# Altium PCB PCB1.L298N.PcbDoc
Units mm, origin at the board's own origin, x right, y up, seen from the top; angles counter-clockwise.
Board outline 67.75 x 52.75 mm, 2 copper layers (Top Layer, Bottom Layer); 20 components, 14 nets, 57 pads, 0 vias.
Unrouted connection lines stored in the file: 10.
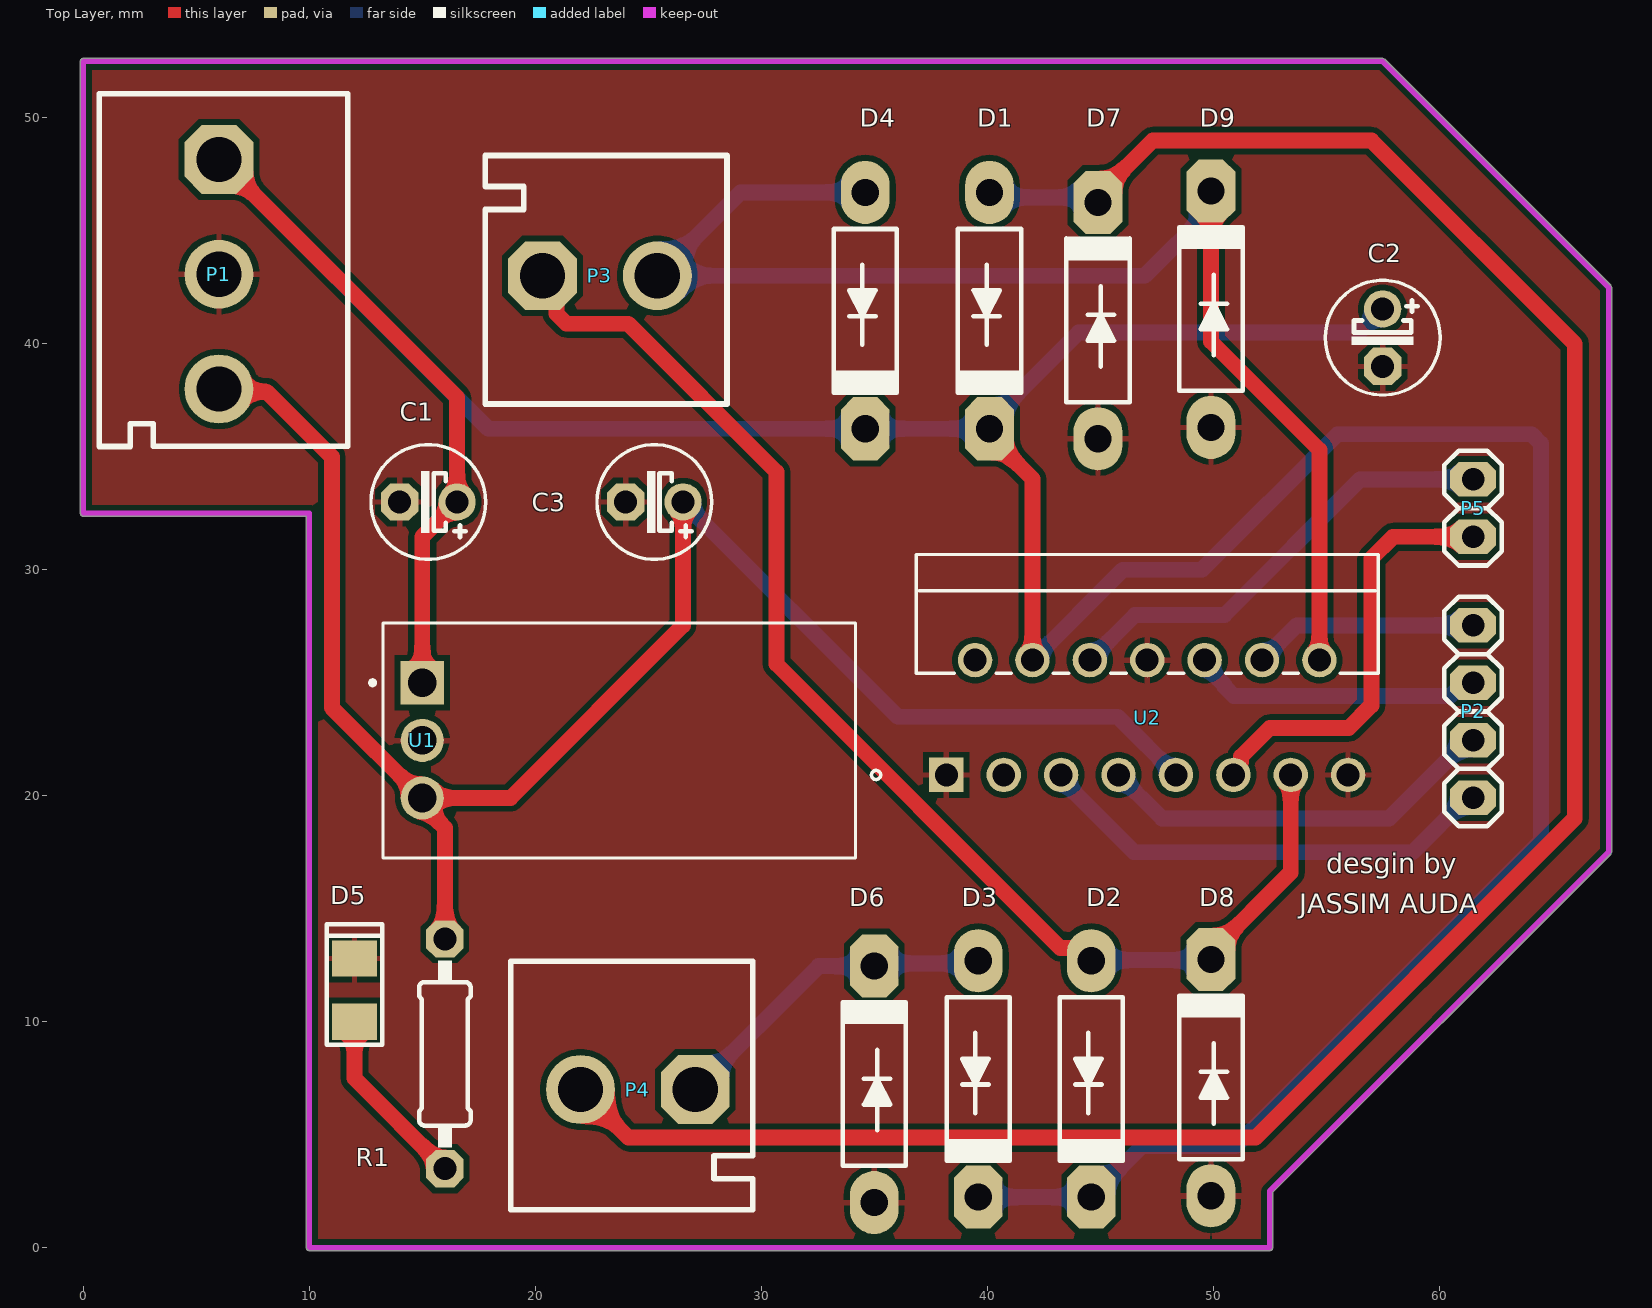
[diagram p0: Top Layer view]
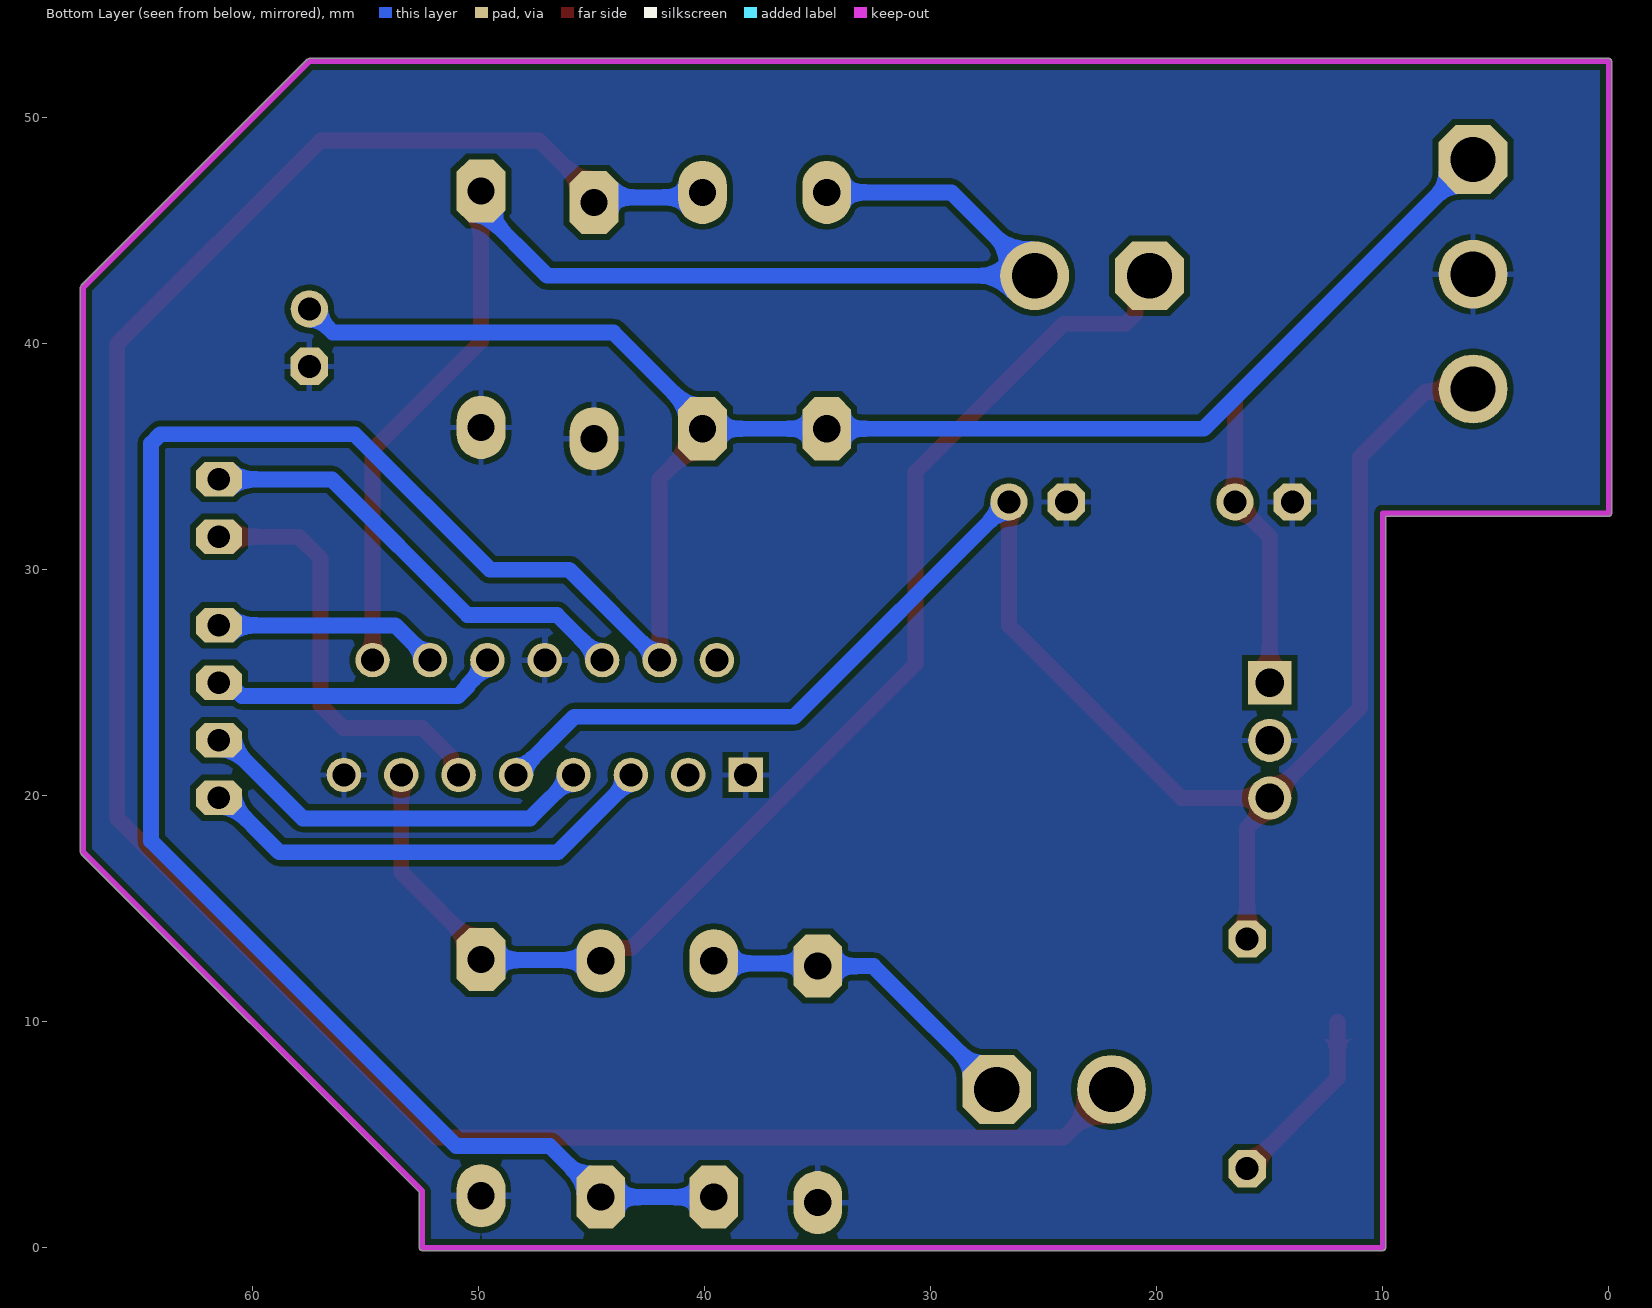
[diagram p1: Bottom Layer view, seen from below]
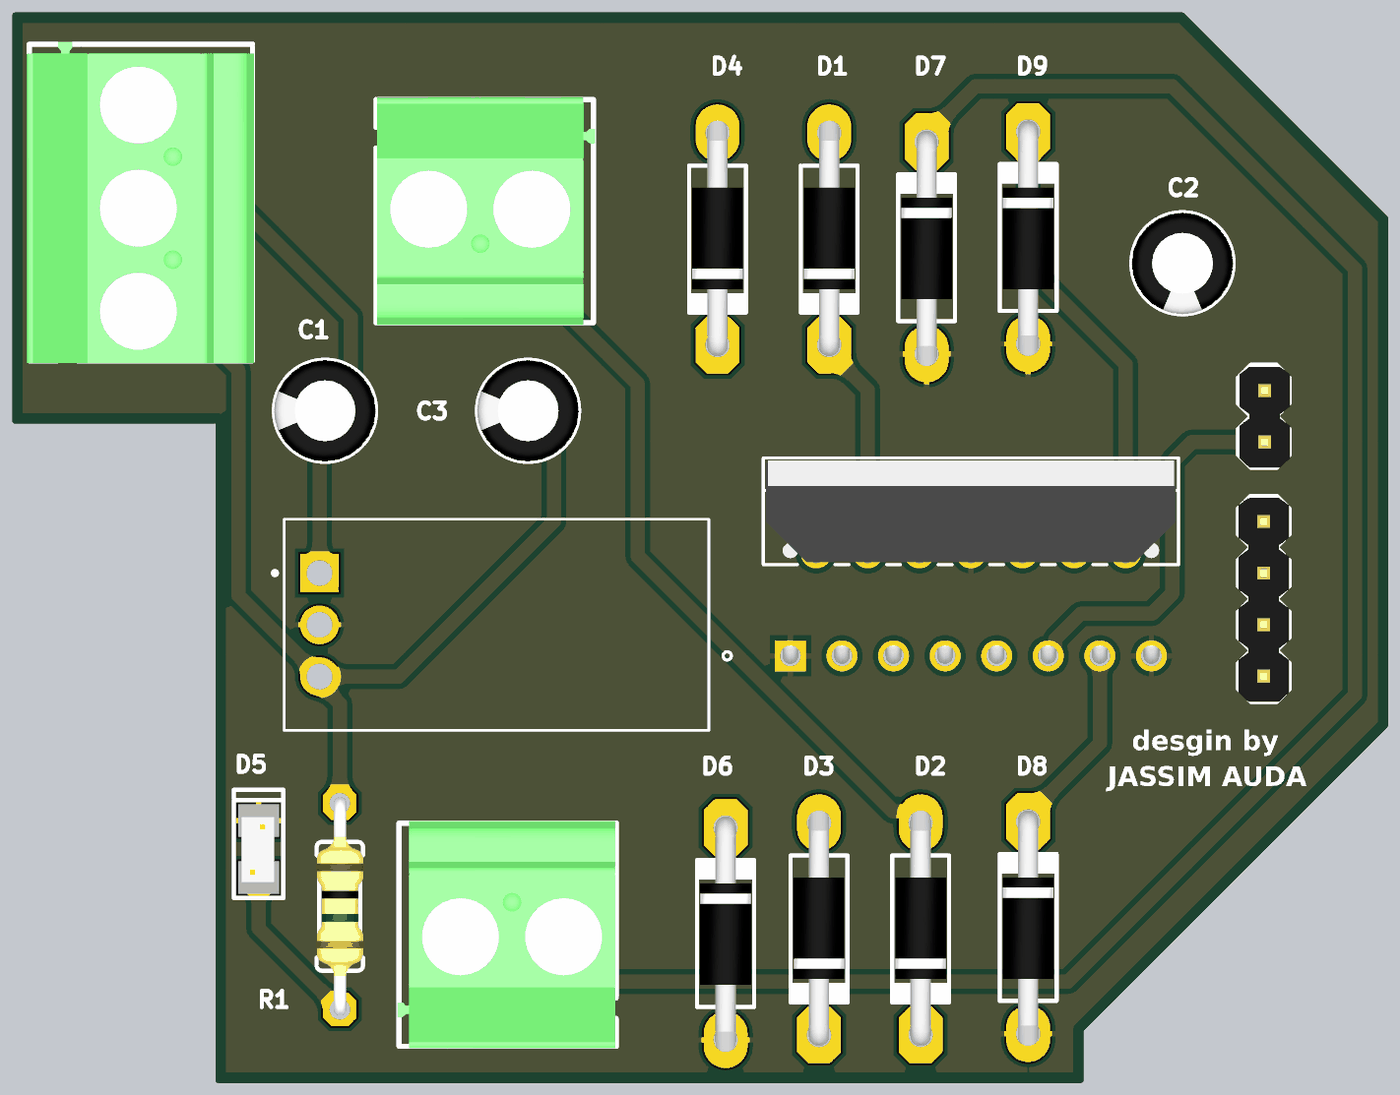
[diagram p2: 3D render of the assembled board from above, using the file's embedded part models]

## Layer stack, top to bottom
Top Solder: solder mask 0.0102, Solder Resist, Dk 3.5
Top Layer: signal copper 0.0356
Dielectric 1: dielectric 0.32, FR-4, Dk 4.8
Bottom Layer: signal copper 0.0356
Bottom Solder: solder mask 0.0102, Solder Resist, Dk 3.5

## Board outline
0,32.373 cw(c0,32.5) -0.127,32.5 -0.127,52.5 cw(c0,52.5) 0,52.627 57.5,52.627 57.59,52.59 67.59,42.59 67.627,42.5 67.627,17.5 67.59,17.41 52.627,2.447 52.627,0 cw(c52.5,0) 52.5,-0.127 10,-0.127 cw(c10,0) 9.873,0 9.873,32.373

## Design rules (kind name [scope] priority, off if disabled: settings)
Clearance [All] p1: gap=0.254 ignorepadtopadclearanceinfootprint=FALSE
PolygonConnect [All] p1: connectstyle=Relief reliefconductorwidth=0.254 reliefentries=4 polygonreliefangle="90 Angle" airgapwidth=0.254
RoutingVias [All] p1: holewidth=0.711 width=1.27 viastyle="Through Hole" minholewidth=0.711 minwidth=1.27 maxholewidth=0.711 maxwidth=1.27
SilkToSolderMaskClearance [IsPad] p1: minsilkscreentomaskgap=0 clearancetoexposedcopper=TRUE
SolderMaskExpansion [All] p1: expansion=0.102 istentingtop=FALSE
SupplyNets "Schematic Supply Nets_2" [InNet('+5')] p1: voltage=0.000
SupplyNets "Schematic Supply Nets_1" [InNet('GND')] p2: voltage=0.000
SupplyNets "Schematic Supply Nets" [InNet('VCC')] p3: voltage=0.000
Width [All] p1: maxlimit=8 minlimit=0.254 preferedwidth=0.254
29 further rules are at their usual default settings.

## Components (designator, comment, footprint, x,y, rotation, side; value= is the part's Value field where it differs from the comment)
C1 "100UF" MY_E2.5-5mm 15.27,33 r180 top
C2 "100uF" MY_E2.5-5mm 57.5,40.27 r270 top
C3 "10UF" MY_E2.5-5mm 25.27,33 r180 top
D1 "1N4007" My_DO41 40,41.5 r90 top
D2 "1N4007" My_DO41 44.5,7.5 r90 top
D3 "1N4007" My_DO41 39.5,7.5 r90 top
D4 "1N4007" My_DO41 34.5,41.5 r90 top
D5 "LED" MY_LED_1206 11.873,11.527 r270 top
D6 "1N4007" My_DO41 35.102,7.2 r270 top
D7 "1N4007" My_DO41 45,41 r270 top
D8 "1N4007" My_DO41 50,7.5 r270 top
D9 "1N4007" My_DO41 50,41.5 r270 top
P1 "Header 3" My_CN3 6.013,43.042 r270 top
P2 "Header 4" My_1X04 61.5,23.73 r90 top
P3 "Header 2" My_CN2 23,43 r0 top
P4 "Header 2" My_CN2 24.4,7.013 r180 top
P5 "Header 2" My_1X02 61.5,34 r90 top
R1 "1K" MY_(0.25w)_0207_10 16,8.58 r270 top
U1 "L7805CV" TO255P1040X460X1968-3 15,25 r270 top
U2 "L298N" Multiwatt15_V_STM_REN 38.19,20.92 r0 top

## Footprints (in the part's own frame and the unit in brackets; to place one, negate y for a bottom-side part, rotate by r counter-clockwise, add the part's x,y. Pads: shape width x height; smd on the part's side, far side on the other; paste and mask are expansions set on the pad)
Multiwatt15_V_STM_REN [mil]
  rect 60x60 / inner round 60 / far side rect 60x60 hole 40 paste-99999 mask+0: 1(0,0)
  round 60 hole 40 paste-99999 mask+0: 2(50,200) 3(100,0) 4(150,200) 5(200,0) 6(250,200) 7(300,0) 8(350,200) 9(400,0) 10(450,200) 11(500,0) 12(550,200) 13(600,0) 14(650,200) 15(700,0)
  silkscreen extent -130,-8 752,384, body extent -48,-15 748,379, height 713
My_1X02 [mil]
  oct 60x80 hole 39.37: 1(-100,0) 2(0,0)
  silkscreen extent -150,-50 50,50, body extent -150,-51 46,47, height 323
My_1X04 [mil]
  oct 60x80 hole 39.37: 1(-150,0) 2(-50,0) 3(50,0) 4(150,0)
  silkscreen extent -200,-50 200,50, body extent -200,-49 196,49, height 323
MY_(0.25w)_0207_10 [mil]
  oct 65x65 hole 40: 1(-200,0) 2(200,0)
  silkscreen extent -163,-45 163,45, body extent -212,-45 212,46, height 96
My_CN2 [mil]
  oct 120x120 hole 78.74: 1(-105.5,0.5)
  round 120 hole 78.74: 2(94.5,0.5)
  silkscreen extent -206,-223 216,210, body extent -203,-227 219,214, height 721
My_CN3 [mil]
  oct 120x120 hole 78.74: 1(-201.5,-0.5)
  round 120 hole 78.74: 2(-1.5,-0.5) 3(198.5,-0.5)
  silkscreen extent -316,-209 299,224, body extent -320,-214 302,227, height 721
My_DO41 [mil]
  oval 110x85 hole 47.24: A(204.71,-4)
  oct 110x85 hole 47.24: K(-207.1,-4)
  silkscreen extent -148,-59 141,51, body extent -228,-53 228,45, height 104
MY_E2.5-5mm [mil]
  round 65 hole 40: +(-50,0)
  oct 65x65 hole 40: -(50,0)
  silkscreen extent -100,-100 100,100, body extent -98,-98 98,98, height 395
MY_LED_1206 [mm]
  rect 1.6x2 smd: A(1.527,0.127) K(-1.273,0.127)
  silkscreen extent -2.79,-1.09 2.54,1.35, body extent -1.45,-0.71 1.75,0.89, height 1.12
TO255P1040X460X1968-3 [mm]
  rect 1.91x1.91 / inner round 1.91 / far side rect 1.91x1.91 hole 1.27: 1(0,0)
  round 1.91 hole 1.27: 2(2.55,0) 3(5.1,0)
  silkscreen extent -2.65,-2.29 7.75,19.18, body extent -2.56,-0.2 7.64,19.06, height 4.5

## Part data
C1 C2 C3: library part "Cap Pol", "Polar capacitor", ASiD Part Number=C-AS, Volte=25v
D1 D2 D3 D4 D6 D7 D8 D9: "1 Amp Diode", ASiD Part Number=1n4007-AS
D5: "Typical INFRARED GaAs LED", ASiD Part Number=LED-AS
P1: "Header, 3-Pin", ASiD Part Number="Header 3-AS"
P2: "Header, 4-Pin", ASiD Part Number="Header 4-AS"
P3 P4 P5: "Header, 2-Pin", ASiD Part Number="Header 2-AS"
R1: library part Res, "Standard resistor", ASiD Part Number=Res-AS
U1: "Linear Voltage Regulator IC Positive Fixed 1 Output 1.5A TO-220", Package="TO-220-3 STMicroelectronics", Check_prices=https://www.snapeda.com/parts/L7805CV/STMicroelectronics/view-part/?ref=eda, MF=STMicroelectronics, MP=L7805CV, SnapEDA_Link=https://www.snapeda.com/parts/L7805CV/STMicroelectronics/view-part/?ref=snap
U2: "Description", Manufacturer_Name="Renesas Electronics", Copyright="Copyright (C) 2025 Ultra Librarian. All rights reserved.", Manufacturer_Part_Number=L298N, RefDes=RefDes, Type="Power Management"

## Nets (pads, with @x,y where several pads share a name; then routed paths per layer and width w, separated by ;. In a path a pad name is that pad's centre, name@x,y a point inside that pad or via, vN(x,y) a via of type N, cw(c..) or ccw(c..) an arc to the next point about the centre after c; other vN are vias at no path point)
+5: C3.+ P1.3 R1.1 U1.3 U2.9 | length 76.6
  Top Layer w0.7: P1.3 6.12,37.88 8.12,37.88 11,35 11,23.9 U1.3 ; R1.1 16,18.573 15,19.573 U1.3 ; C3.+ 26.54,27.54 18.9,19.9 U1.3
  Bottom Layer w0.7: C3.+ 36.04,23.5 45.77,23.5 U2.9
EN1: P5.1 U2.11 | length 19.1
  Top Layer w0.7: U2.11 50.89,21.143 51.236,21.489 51.236,21.736 52.5,23 56,23 57,24 57,30.5 57.96,31.46 P5.1
EN2: P5.2 U2.6 | length 20.3
  Bottom Layer w0.7: U2.6 46.54,28 50.5,28 56.5,34 P5.2
GND: C1.- C2.- C3.- D5.K D6.A D7.A D8.A D9.A P1.2 U1.2 U2.1 U2.8 U2.15
IN1: P2.1 U2.5 | length 20.8
  Bottom Layer w0.7: U2.5 43.27,20.73 46.5,17.5 58.826,17.5 61.246,19.92 P2.1
IN2: P2.2 U2.7 | length 17.9
  Bottom Layer w0.7: U2.7 47.73,19 57.786,19 61.246,22.46 P2.2
IN3: P2.3 U2.10 | length 13
  Bottom Layer w0.7: U2.10 49.62,25.777 50.505,24.892 50.505,24.822 50.915,24.412 60.482,24.412 61.07,25 P2.3
IN4: P2.4 U2.12 | length 10
  Bottom Layer w0.7: U2.12 53.7,27.54 P2.4
NetD5_A: D5.A R1.2 | length 8.2
  Top Layer w0.7: D5.A 12,7.5 R1.2
OUT1: D3.A D6.K P4.1 | length 14.9
  Bottom Layer w0.7: P4.1 32.54,12.46 D6.K 35.12,12.58 39.482,12.58 D3.A
OUT2: D1.A D7.K P4.2 | length 102.9
  Top Layer w0.7: P4.2 24.128,4.872 51.872,4.872 66,19 66,40 57,49 47.32,49 44.898,46.578 D7.K
  Bottom Layer w0.7: D1.A 40.321,46.48 44.679,46.48 D7.K
OUT3: D2.A D8.K P3.1 U2.13 | length 57.4
  Top Layer w0.7: P3.1 20.937,42.396 20.937,41.331 21.383,40.885 24.115,40.885 30.673,34.327 30.673,25.827 43.236,13.264 44.038,13.264 D2.A ; D8.K 49.898,13.078 53.43,16.61 U2.13
  Bottom Layer w0.7: D2.A 44.632,12.73 49.868,12.73 D8.K
OUT4: D4.A D9.K P3.2 U2.14 | length 59
  Top Layer w0.7: D9.K@49.898,46.26 49.898,40.102 54.7,35.3 U2.14
  Bottom Layer w0.7: D4.A 29.087,46.7 P3.2 46.968,43.013 49.898,45.943 D9.K@49.898,46.26
VCC: C1.+ C2.+ D1.K D2.K D3.K D4.K P1.1 U1.1 U2.4 | length 173.5
  Top Layer w0.7: P1.1 16.54,37.62 C1.+ 15,31.46 U1.1 ; D1.K 40.102,35.922 42,34.024 U2.4
  Bottom Layer w0.7: P1.1 17.92,36.24 D4.K D1.K ; D3.K D2.K 46.862,4.5 51,4.5 64.5,18 64.5,35.59 64.09,36 55.5,36 49.5,30 46,30 U2.4 ; D1.K@40.102,36.557 44.045,40.5 56.46,40.5 C2.+
pads on no net: U2.2 U2.3

## Polygon pours and split planes (outlines as drawn)
GND on Top Layer "GND_L01_P000" (solid, remove dead copper, pour order 0): -4.5,58.5 -2.5,56.5 -2.5,-1.5 75,-1.5 78,1.5 74,5.5 74,59 -4,59
GND on Bottom Layer "GND_L02_P001" (solid, remove dead copper, pour order 1): -3.5,54.5 -3.5,-8 81.5,-8 82.5,-7 82.5,58 -3,58 -5,56

## Keep-outs
Keep-Out Layer:
  lines w0.254: 0,32.5 0,52.5 57.5,52.5 67.5,42.5 67.5,17.5 52.5,2.5 52.5,0 10,0 10,32.5 0,32.5

## Silkscreen, mask and mechanical layers (free items; w line width, h text height)
Top Overlay:
  text "desgin by" at 55,16.276 h1.5
  text "JASSIM AUDA" at 53.81,14.515 h1.5
Mechanical 1:
  lines w0.254: 53.744,2.103 54.103,1.744 ; 54.642,3.361 53.924,1.924 ; 55.361,2.642 53.924,1.924 ; 55.5,3.5 53.924,1.924 ; 66.848,14.848 68.424,16.424 ; 66.987,15.705 68.424,16.424 ; 67.705,14.987 68.424,16.424 ; 68.244,16.603 68.603,16.244
  text "20.506 (mm)" at 56.326,3.033 h1.52 r45

## Dimensions
67.5,17.5 to 53,3 on Mechanical 1
52,2.5 to 52.5,0 on Mechanical 1
10,0 to 52.5,0 on Mechanical 1
10,32.5 to 10,0 on Mechanical 1
10,32.5 to 0,32.5 on Mechanical 1
-0.5,52.5 to -0.5,32.5 on Mechanical 1
67.5,42.5 to 67.881,17.5 on Mechanical 1
57.5,52.5 to 67.5,42.5 on Mechanical 1
0,52.5 to 57.5,53 on Mechanical 1

## Text inside footprints (layer, text, board x,y; h text height)
U2: Mechanical 13 "TAB" at 46.604,29.432 h0.64